# Altium PCB Main-Board-V1.1.PcbDoc (part 5 of 5)
Units mil, origin at the board's own origin, x right, y up, seen from the top; angles counter-clockwise.
Board outline 3599.72 x 1771.65 mil, 4 copper layers (Top Layer, Layer 1, Layer 2, Bottom Layer), stack 62.449 mil thick; 176 components, 132 nets, 634 pads, 296 vias.
Unrouted connection lines stored in the file: 17.
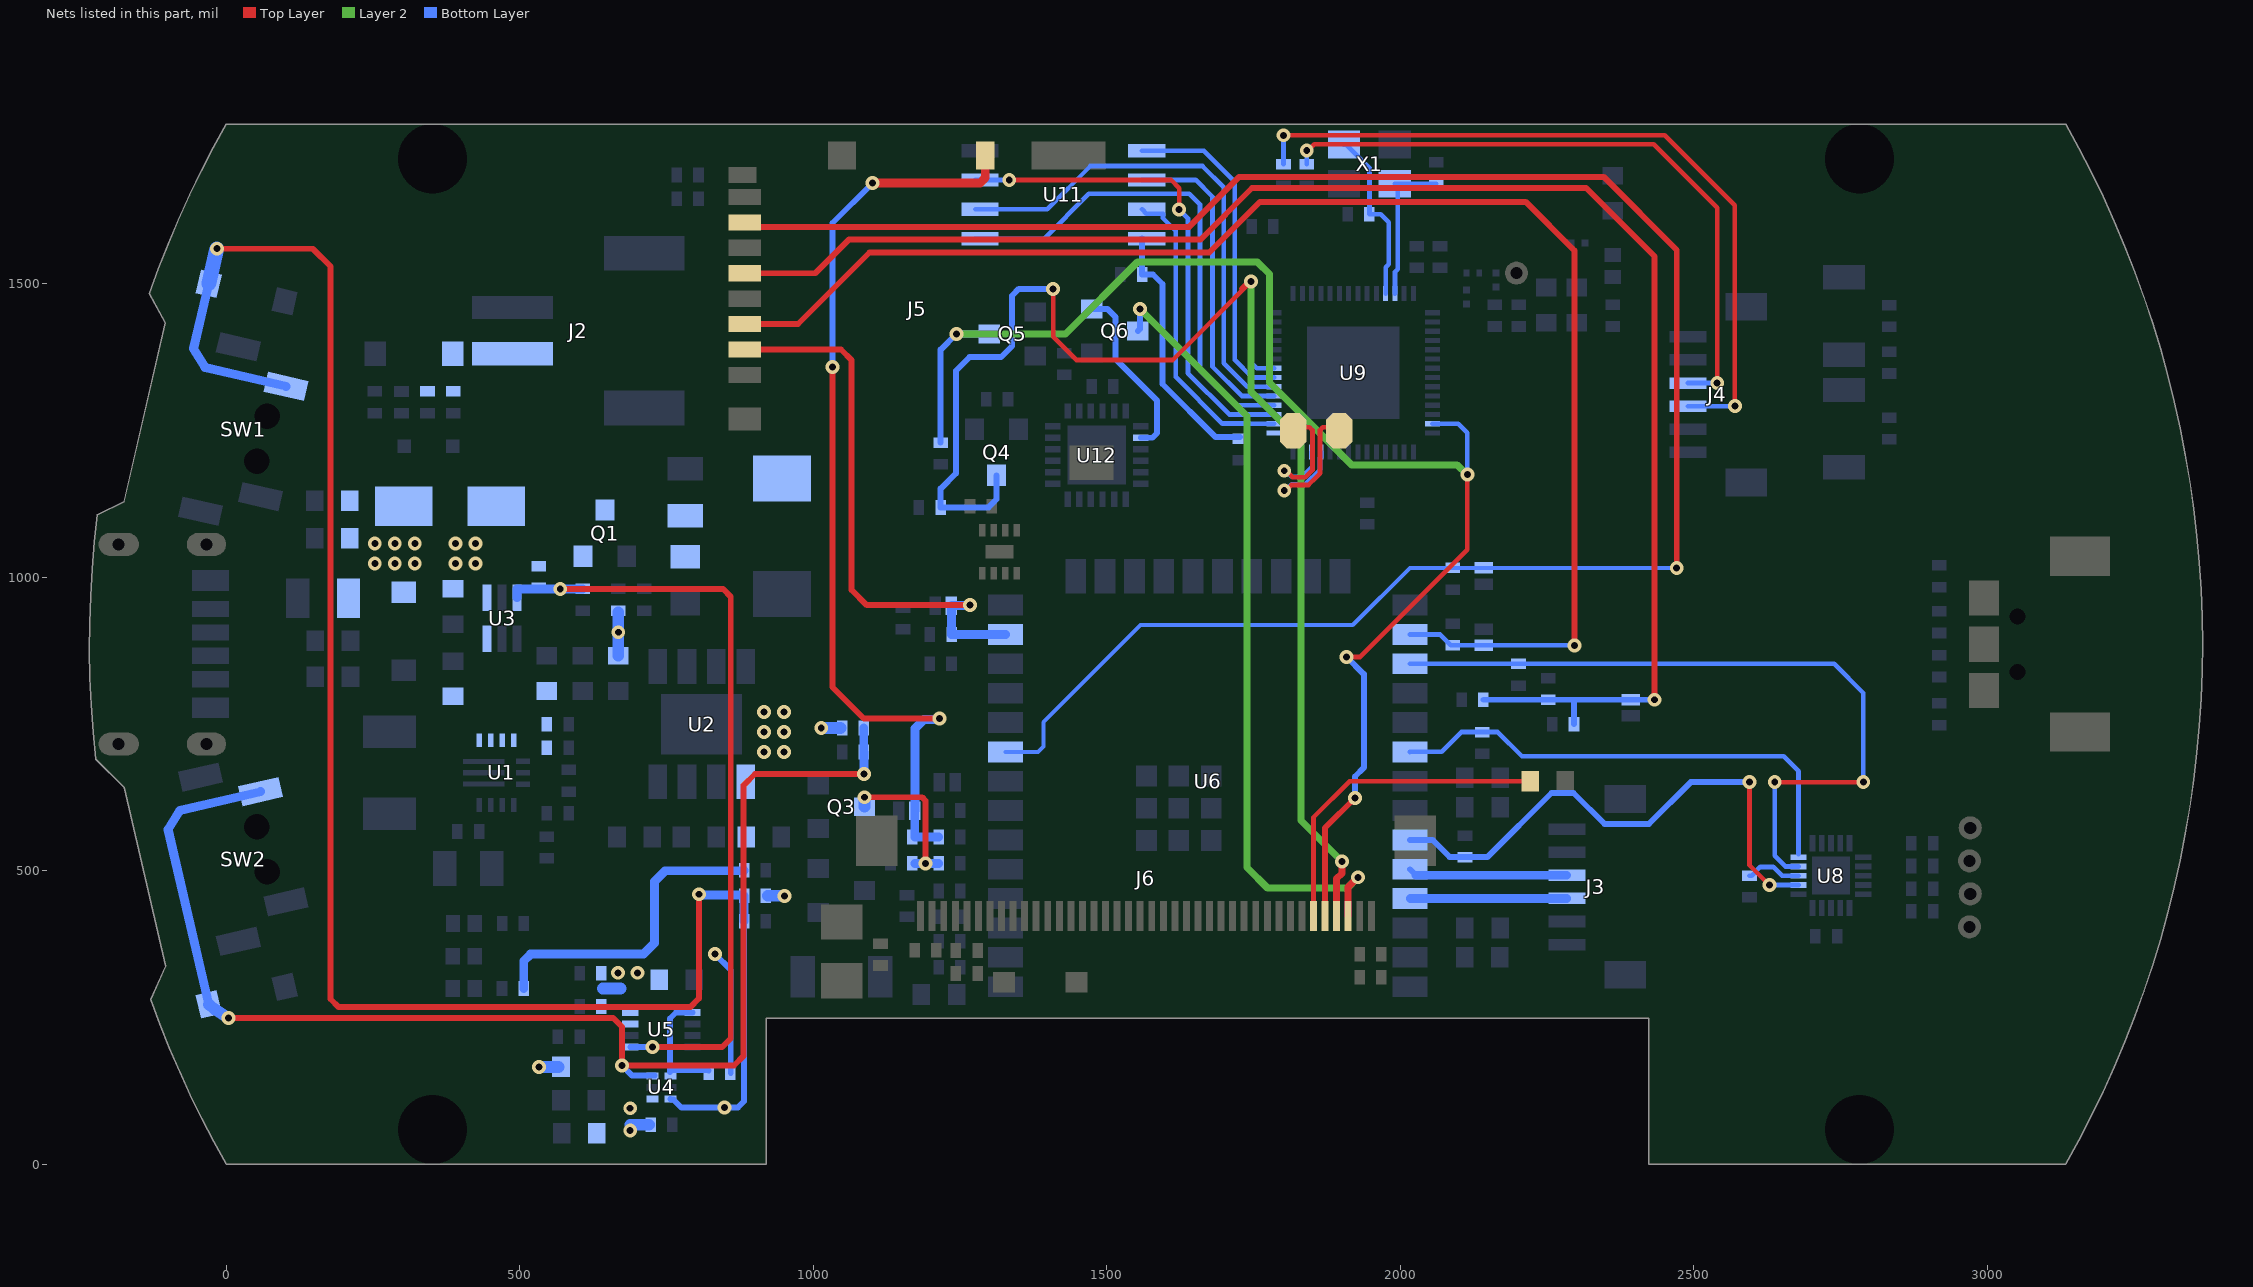
[diagram p5: the nets of this part, all layers, seen from the top]

## Via types
v1: diameter 23.62, hole 11.81, Top Layer to Bottom Layer, 296 vias

## Nets (pads, with @x,y where several pads share a name; then routed paths per layer and width w, separated by ;. In a path a pad name is that pad's centre, name@x,y a point inside that pad or via, vN(x,y) a via of type N, cw(c..) or ccw(c..) an arc to the next point about the centre after c; other vN are vias at no path point) (continued)
PB2_ILV: Q3.3 R22.1 R27.1 | length 269.4
  Top Layer w10: v1(1087.47,625) 1185.54,625 1191.39,619.15 v1(1191.39,512.4)
  Bottom Layer w15: R22.1@1173.67,512.38 v1@1193.72,512.38 ; v1@1193.74,512.36 R27.1@1213.83,512.36
  Bottom Layer w20: Q3.3@1087.47,608.86 v1(1087.47,625)
PB_1: D2.2 R9.1 R23.1 SW1.1 U4.3 | length 3185.5
  Top Layer w10: v1(-15.87,1559.51) 147.49,1559.51 177.57,1529.43 177.57,281.43 191.55,267.45 790.48,267.45 805.19,282.16 v1(805.19,459.85)
  Bottom Layer w10: U4.3@756.58,111.12 757.49,110.21 761.82,110.21 775.44,96.6 v1(848.97,96.6) 852.66,96.6 871.6,96.6 882.29,107.29 R23.1@882.29,413.96
  Bottom Layer w15: D2.2@-29.86,1499.55 -55.64,1389.05 -35.83,1357.18 SW1.1@102.05,1325.01 ; v1@809.19,459.85 810.55,458.49 880.93,458.49 R9.1@882.29,457.13 R23.1@882.29,413.96
  Bottom Layer w25: D2.2@-29.86,1499.55 v1(-15.87,1559.51)
PB_2: D3.2 R11.1 R24.1 SW2.1 U4.6 | length 2299.6
  Top Layer w10: v1@3.89,244.88 8.3,249.3 659.01,249.3 674.5,233.81 v1(674.5,167.99) 864.96,167.99 881.51,184.54 881.51,645.45 900.82,664.76 v1(1086.57,664.76)
  Bottom Layer w10: v1(674.5,167.99) 691.69,150.81 U4.6@730.1,150.81
  Bottom Layer w15: D3.2@-29.42,272.21 -99.04,570.57 -79.22,602.44 SW2.1@58.65,634.61 ; R11.1@1086.18,743 R24.1@1086.18,702.06 1086.37,701.87 1086.37,664.95 v1(1086.57,664.76)
  Bottom Layer w20: D3.2@-29.42,272.21 -18.9,263.56 v1@3.87,249.38
  other v1: 3.89,249.3
PWR_EN: R37.2 R69.1 U3.3 U5.5 | length 1352.7
  Top Layer w10: v1(569.1,980.07) 846.36,980.07 859.58,966.84 859.58,214.22 844.79,199.43 v1(726.28,199.43)
  Bottom Layer w10: U5.5@688.28,199.43 v1(726.28,199.43)
  Bottom Layer w15: U3.3@495.59,965.04 495.59,979.69 495.96,980.07 R37.2@607.5,980.04
RESET: Q6.2 U12.2 | length 304.6
  Bottom Layer w10: Q6.2@1474.33,1456.8 1474.56,1456.57 1501.58,1456.57 1514.71,1443.45 1514.71,1371.94 1585.98,1300.66 1585.98,1245.58 1577.89,1237.49 U12.2@1558.11,1237.49
RST_OUT: R13.1 U4.1 U5.1 | length 199.9
  Bottom Layer w10: 756.11,156.97 756.11,160.08 ; U5.1@794.58,258.49 766.41,258.49 756.11,248.19 756.11,160.08 ; R13.1@822.01,159.37 756.69,160.07 756.11,160.08
RXD0: J3.4 U6.34 | length 271.4
  Bottom Layer w10: U6.34@2016.54,502.36 U6.34@2026.77,492.13
  Bottom Layer w15: U6.34@2026.77,492.13 J3.4@2283.72,492.13
RXD0-2: J4.4 R68.2 | length 1132.6
  Top Layer w8: v1(1840.83,1726.58) 1842.55,1726.58 1853.32,1737.35 2431.65,1737.35 2540,1629 v1(2540,1330.69)
  Bottom Layer w8: R68.2@1840.82,1703.55 v1(1840.83,1726.58) 1840.82,1713.55 ; J4.4@2490.3,1330.69 v1(2540,1330.69)
SCL: J6.4 Q4.3 R56.2 U9.36 | length 2499.9
  Top Layer w8: v1(1408.79,1491.14) 1408.79,1409.76 1448.69,1369.86 1612.06,1369.86 v1(1745.57,1503.38) 1741.34,1503.38 1729.11,1491.14
  Top Layer w12: J6.4@1891.66,423 1891.66,486.57 1900.55,495.46 v1(1900.55,515.88)
  Layer 2 w12: v1(1745.57,1503.38) 1745.57,1316.49 1831.03,1231.03 1831.03,585.4 v1(1900.55,515.88)
  Bottom Layer w8: v1(1745.57,1503.38) 1745.57,1366.28 1755.98,1355.87 U9.36@1785.16,1355.87
  Bottom Layer w10: Q4.3@1312.35,1173.41 1312.35,1132.64 1298.41,1118.7 R56.2@1217.13,1118.7 1217.13,1150.8 1243.17,1176.84 1243.17,1351.65 1266.27,1374.74 1319.77,1374.74 1338.59,1393.57 1338.59,1479.4 1350.34,1491.14 v1(1408.79,1491.14)
SD_CLK: D8.2 J5.5 R2.1 R43.1 R46.2 | length 2745.8
  Top Layer w10: J5.5@883.69,1517.69 1003.47,1517.69 1060.78,1575 1659.8,1575 1747.62,1662.82 2316.69,1662.82 2433,1546.51 v1(2433,791.11)
  Bottom Layer w10: R46.2@2141.7,791.11 R43.1@2252.22,791.11 2296.04,791.11 ; R2.1@2296.04,749.6 2296.04,791.11 ; v1(2433,791.11) 2296.04,791.11
SD_CMD: D7.2 J5.3 R42.1 U6.26 | length 2494.1
  Top Layer w10: J5.3@883.69,1431.08 974.17,1431.08 1096,1552.91 1674.71,1552.91 1761.09,1639.3 2213.7,1639.3 2296.82,1556.18 v1(2296.82,883.86)
  Bottom Layer w8: U6.26@2016.54,902.36 2067.66,902.34 2086.14,883.86 D7.2@2142.69,883.86 v1(2296.82,883.86)
SD_CS: D6.2 J5.2 R17.1 U6.13 | length 965.7
  Top Layer w10: J5.2@883.69,1387.77 1047.19,1387.77 1065.55,1369.42 1065.55,978.19 1091.37,952.36 v1(1267,952.36)
  Bottom Layer w15: v1(1267,952.36) 1266.37,951.73 1235.96,951.73 D6.2@1235.33,951.1 1235.58,950.86 1235.58,902.61 R17.1@1235.82,902.36 U6.13@1327.56,902.36
SD_DATA0: D9.2 J5.7 R44.1 U6.9 | length 3516.3
  Top Layer w10: J5.7@883.69,1604.3 891.21,1596.79 1640.58,1596.79 1725.71,1681.91 2346.46,1681.91 2471,1557.37 v1(2471,1015.73)
  Bottom Layer w7: U6.9@1327.56,702.36 1382.74,702.36 1392.06,711.68 1392.06,752.88 1557.52,918.34 1919.11,918.34 2016.5,1015.73 R44.1@2089.64,1015.73 D9.2@2142.69,1015.73 v1(2471,1015.73)
SD_DET: D10.2 J5.SW-A R28.1 R45.1 | length 1599.9
  Top Layer w10: v1(1033,1358.24) 1033,812.57 1086.57,759 v1(1215,759)
  Top Layer w15: v1(1101,1671.23) 1284.14,1671.23 1293.14,1680.24 J5.SW-A@1293.14,1718.48
  Bottom Layer w10: v1(1033,1358.24) 1033,1603.23 v1(1101,1671.23)
  Bottom Layer w15: D10.2@1173.65,602.36 D10.2@1172.93,602.36 ; R28.1@1213.83,557.36 1173.65,557.36 1172.93,558.08 D10.2@1172.93,602.36 ; v1(1215,759) 1213.35,757.35 1188.58,757.35 1173.29,742.06 1173.29,602.72 D10.2@1172.93,602.36
SDA: J6.5 Q5.3 R58.2 U9.13 | length 2457.8
  Top Layer w8: v1(1908.7,864.14) 1931.53,864.14 2114.3,1046.91 v1(2114.3,1174.7)
  Top Layer w10: J6.5@1871.98,423 1871.98,572.89 v1(1922.94,623.84)
  Layer 2 w12: v1(1243.97,1414.38) 1429.99,1414.38 1552.12,1536.51 1756.93,1536.51 1777.25,1516.19 1777.25,1331.34 1917.23,1191.37 2096.98,1191.37 2113.64,1174.7 v1(2114.3,1174.7)
  Bottom Layer w8: U9.13@2054.84,1261.39 2098.67,1261.39 2114.3,1245.75 v1(2114.3,1174.7)
  Bottom Layer w10: R58.2@1217.13,1229.27 1217.13,1387.54 v1(1243.97,1414.38) ; v1(1908.7,864.14) 1938.06,834.78 1938.06,675.51 1922.94,660.38 v1(1922.94,623.84)
  Bottom Layer w12: v1(1243.97,1414.38) Q5.3@1299.71,1414.39
SPICLK: U9.33 U11.6 | length 546.9
  Bottom Layer w8: U11.6@1560.22,1676.58 U11.6@1568.22,1676.58 1651.45,1676.58 1680.2,1647.83 1680.2,1358.36 1729.93,1308.63 U9.33@1785.16,1308.63
SPICS0: U9.32 U11.1 | length 855
  Bottom Layer w8: U11.1@1276.36,1576.58 U11.1@1284.36,1576.58 1393.3,1576.58 1469.76,1653.04 1640.68,1653.04 1658.78,1634.94 1658.78,1352.74 1718.64,1292.88 U9.32@1785.16,1292.88
SPID: U9.35 U11.5 | length 563.1
  Bottom Layer w8: U11.5@1560.22,1726.58 1665.7,1726.58 1718.34,1673.94 1718.34,1369.98 1748.19,1340.13 U9.35@1785.16,1340.13
SPIHD: U9.30 U11.7 | length 526.4
  Bottom Layer w8: U11.7@1560.22,1626.58 1567.64,1619.17 1595.91,1619.17 1595.91,1611.28 1617.52,1589.67 1617.52,1341.1 1696.98,1261.64 1733.98,1261.64 1734.23,1261.39 U9.30@1785.16,1261.39
SPIQ: U9.34 U11.2 | length 870.7
  Bottom Layer w8: U11.2@1276.36,1626.58 U11.2@1284.36,1626.58 1398.58,1626.58 1472.41,1700.41 1663.14,1700.41 1699.53,1664.02 1699.53,1364.24 1739.39,1324.38 U9.34@1785.16,1324.38
SPIWP: U9.31 U11.3 | length 857.4
  Top Layer w8: v1(1334,1676.58) 1609.54,1676.58 1623.41,1662.71 v1(1623.41,1626.46)
  Bottom Layer w8: U11.3@1276.36,1676.58 v1(1334,1676.58) ; v1@1331.01,1673.59 v1(1334,1676.58) ; v1@1331.01,1676.58 v1(1334,1676.58) ; v1(1623.41,1626.46) 1638.32,1611.55 1638.32,1347.5 1708.69,1277.13 U9.31@1785.16,1277.13
TOUCH_CHNG: R48.1 U6.27 U8.14 | length 1269.1
  Top Layer w8: v1(2638,650.75) v1(2788.84,650.75)
  Bottom Layer w8: U6.27@2016.54,852.36 R48.1@2201.43,852.36 2739.11,852.36 2788.84,802.63 v1(2788.84,650.75) ; v1(2638,650.75) 2638,525.37 2656.15,507.22 U8.14@2678.61,507.22
TOUCH_RST: R54.2 U8.13 | length 95.9
  Bottom Layer w8: R54.2@2595,491.47 2598.5,491.47 2613.39,506.36 2635.54,506.36 2650.42,491.47 U8.13@2678.61,491.47
TOUCH_SCL: R47.1 U6.30 U8.15 | length 845.7
  Bottom Layer w8: U6.30@2016.17,702 U6.30@2016.54,702.36 2070.51,702.36 2104.25,736.1 R47.1@2139.69,736.1 2166.09,736.1 2207.48,694.71 2653.29,694.71 2678.61,669.39 2678.61,527.89
TOUCH_SDA: R34.1 U6.33 U8.12 | length 925.9
  Top Layer w8: v1(2595,650.75) 2595,509.55 v1(2629,475.55)
  Bottom Layer w8: v1(2629,475.55) 2629.09,475.64 2678.52,475.64 U8.12@2678.61,475.73
  Bottom Layer w10: U6.33@2016.54,552.36 2055.26,552.36 2084.09,523.53 2110.2,523.53 2148.88,523.53 2257.6,632.25 2295.28,632.25 2348.19,579.34 2423.6,579.34 2495.02,650.75 v1(2595,650.75)
TP_INT: J6.6 R62.1 | length 562.6
  Top Layer w8: J6.6@1852.29,423 1852.29,591.03 1913.62,652.36 R62.1@2221.43,652.36
TP_RESET: J6.3 Q6.3 | length 1350.1
  Top Layer w12: J6.3@1911.35,423 1911.35,471.76 v1(1928.26,488.67)
  Layer 2 w12: v1(1556.51,1456.8) 1739.06,1274.26 1739.06,505.38 1774.36,470.08 1909.67,470.08 v1(1928.26,488.67)
  Bottom Layer w10: Q6.3@1553.07,1419.4 1556.51,1422.84 v1(1556.51,1456.8)
TXD0: J3.3 U6.35 | length 267.3
  Bottom Layer w10: U6.35@2016.54,452.36 U6.35@2016.93,452.76
  Bottom Layer w15: U6.35@2016.93,452.76 J3.3@2283.72,452.76
TXD0-2: J4.3 R55.2 | length 1289.2
  Top Layer w8: v1(1801.02,1752.68) 2450.58,1752.68 2570,1633.26 v1(2570,1291.32)
  Bottom Layer w8: R55.2@1801.02,1703.55 v1(1801.02,1752.68) ; J4.3@2490.3,1291.32 v1(2570,1291.32)
USB_D_N: TP6.2 U9.25 | length 294.1
  Top Layer w8: v1(1802.39,1147.62) 1805.55,1147.62 1814.89,1156.97 1843.63,1156.97 1855.89,1169.22 1863.51,1176.84 1863.51,1250.54 1868.19,1255.22 1882.34,1255.22 TP6.2@1896.38,1269.26
  Bottom Layer w8: v1(1802.39,1147.62) 1805.27,1147.62 1815.58,1157.94 1838.47,1157.94 1863.51,1182.98 1863.51,1203.32 1864.88,1204.69 U9.25@1864.88,1213.16
USB_D_P: TP6.1 U9.26 | length 251.8
  Top Layer w8: v1(1802.39,1181.25) 1805.27,1181.25 1816.55,1169.97 1838.25,1169.97 1850.51,1182.22 1850.51,1250.54 1845.82,1255.22 1831.67,1255.22 TP6.1@1817.64,1269.26
  Bottom Layer w8: v1(1802.39,1181.25) 1805.27,1181.25 1815.58,1170.94 1833.08,1170.94 1850.51,1188.36 1850.51,1203.32 1849.13,1204.69 U9.26@1849.13,1213.16
VBATT: C10.2 C13.2 D4.2 J2.2 L1.2 Q1.3 R6.2 R40.2
VCC: C11.1 C15.2 C16.2 C17.2 C18.2 D5.1 Q1.2 R9.2 R11.2 R13.2 R14.1 R16.2 R69.2 U3.1 U4.4 U5.7 U5.8 | length 370.4
  Bottom Layer w10: v1(832.74,357.83) 859.58,330.98 R13.2@859.58,155.49
  Bottom Layer w20: v1(533,165.72) R16.2@566.31,165.72 ; 641.57,299.31 671.62,299.31 ; v1@688.28,67.31 C18.2@720.34,67.31 ; R9.2@922.44,457.13 v1(951.35,457.13) ; v1(1013.73,743) R11.2@1046.37,743
  other v1: 688.28,57.31 688.28,95.26 667.62,325.98 700.43,325.98 390.94,1023.43 425,1023.43 390.94,1057.49 425,1057.49
VCC_SYS: C5.2 C12.1 R12.2 R65.2 U1.4 U1.5 U1.6 U1.7 U3.6
VDD-SDIO: C41.2 C46.1 U9.29 U11.8 | length 442.2
  Bottom Layer w10: U11.8@1560.22,1576.58 C46.1@1560.22,1515.58 1578.79,1515.58 1595.16,1499.21 1595.16,1329.13 1685.83,1238.46 C41.2@1727.04,1238.46
VUSB: C1.2 C2.2 C8.2 C9.2 D1.2 D5.2 F1.2 R4.2 R5.2 R18.1 U2.1 | length 624.5
  Bottom Layer w10: R18.1@668,940.2 R18.1@668,943.04
  Bottom Layer w15: R4.2@506.85,299.31 506.85,346.11 518.57,357.83 710.67,357.83 729.5,376.66 729.5,481.39 747.8,499.69 881.53,499.69 C2.2@882.29,500.45
  Bottom Layer w20: R5.2@668,866.06 v1(668,906.16) R18.1@668,940.2
  other v1: 916.15,701.88 950.21,701.88 916.15,735.94 950.21,735.94 916.15,770 950.21,770 253.21,1023.43 287.27,1023.43 321.34,1023.43 253.21,1057.49 287.27,1057.49 321.34,1057.49
XTAL_N: C43.2 U9.53 X1.3 | length 301.4
  Bottom Layer w8: X1.3@1904.25,1736.93 1908.19,1736.93 1947.56,1697.56 C43.2@1947.56,1618.23 1966.56,1618.23 1980.53,1604.26 1980.53,1533.12 1975.12,1527.71 U9.53@1975.12,1482.84
XTAL_P: C42.2 U9.54 X1.1 | length 261.5
  Bottom Layer w8: U9.54@1990.87,1482.84 1991.2,1483.17 1991.2,1520.04 1995.53,1524.37 1995.53,1665.33 X1.1@1990.87,1670 C42.2@2061.34,1670
pads on no net: J5.1 J5.8 J6.33 J6.34 SW1.MH SW1.MP SW2.MH SW2.MP SW4. U3.4 U6.14 U6.16 U6.17 U6.18 U6.19 U6.20 U6.21 U6.22 U6.23 U6.24 U6.29 U6.32 U8.1 U8.6 U8.7 U8.10 U8.16 U8.17 U8.18 U8.19 U8.20 U9.28 U9.38 U9.39 U9.40 U9.41 U9.42 U10.5 U10.7 U12.1 U12.3 U12.8 U12.10 U12.11 U12.12 U12.13 U12.14 U12.15 U12.16 U12.17 U12.22

## Polygon pours and split planes (outlines as drawn)
3V3-DIS on Bottom Layer "3V3-DIS_L04_P003" (solid, pour order 3): 1067.87,934.65 1067.87,1531.14 1078.86,1542.13 1173.87,1542.13 1189.58,1526.42 1189.58,1198.45 1189.58,1049.3 1173.29,1033.02 1173.29,934.65
3V3 on Bottom Layer "3V3_L04_P000" (solid, pour order 0): 422.01,623.67 422.01,451 469.25,451 498,422.25 498,383.27 610.97,383.27 610.97,529.86 483.11,529.86 475.1,537.86 475.1,623.67
VCC_SYS on Bottom Layer "VCC_SYS_L04_P023" (solid, pour order 23): 419.19,917.6 419.19,827.37 403.89,812.06 368.89,812.06 368.89,727.37 385.97,710.28 524,710.28 537.37,696.91 555.37,696.91 555.37,782.56 563.87,791.06 563.87,821.06 479.75,821.06 452.28,848.52 452.28,917.6
NetL3_2 on Bottom Layer "NETL3_2_L04_P022" (solid, pour order 22): 378.33,652.02 368.16,641.84 241.03,641.84 208.57,609.38 208.57,569.53 352.09,569.53 419.6,637.04 473.92,637.04 473.92,652.02
NetL3_1 on Bottom Layer "NETL3_1_L04_P021" (solid, pour order 21): 473.92,696.91 381.12,696.91 323.34,754.69 323.34,764.42 208.57,764.42 208.57,700.12 226.76,681.94 473.92,681.94
VBATT on Bottom Layer "VBATT_L04_P010" (solid, pour order 10): 711,1002.74 808.15,1002.74 808.15,1031.82 1050,1031.82 1050,1400.32 410.91,1400.32 410.91,1175.89 615.52,1175.89 615.52,1088 711,1088
GND on Bottom Layer "GND_L04_P020" (solid, remove dead copper, pour order 20): 0,0 cw(c1566.86,885.83) 0,1771.65 3133.72,1771.65 cw(c1566.86,885.83) 3133.72,0 2423.66,0 2423.66,248.66 920.25,248.66 920.25,0
NetL1_1 on Bottom Layer "NETL1_1_L04_P017" (solid, pour order 17): 829.51,887.75 861.27,887.75 861.27,818.31 980,818.31 980,931.2 1050,931.2 1050,1010.78 829.51,1010.78
VUSB on Bottom Layer "VUSB_L04_P019" (solid, pour order 19): 869.21,680.91 897.57,680.91 897.57,797.41 980,797.41 980,584.86 920.79,584.86 920.58,584.65 920.58,522.95 900.29,522.95 900.29,487.76 869.4,487.76 869.21,487.95
VCC on Bottom Layer "VCC_L04_P008" (solid, pour order 8): 645,1068.28 595,1068.28 595,1154.46 368.89,1154.46 368.89,942.4 452.28,942.4 452.28,1024.97 462.91,1035.6 491.26,1035.6 517.26,1009.6 645,1009.6
VCC on Bottom Layer "VCC_L04_P007" (solid, remove dead copper, pour order 7): 616.47,69.81 655.74,69.81 655.74,117.03 736.51,117.03 736.51,20.39 616.47,20.39
NetF1_1 on Bottom Layer "NETF1_1_L04_P005" (solid, pour order 5): 18.73,959.45 18.73,997.56 141.64,997.56 141.64,931.89 -69.95,931.89 -82.55,919.29 -82.55,852.36 -69.95,839.76 5.04,839.76 5.04,812.2 -140.82,812.2 -154.46,825.84 -154.46,945.81 -140.82,959.45
3V3-DIS on Top Layer "3V3-DIS_L01_P028" (solid, pour order 28): 1365.17,357.37 1343.38,335.57 1343.38,292.11 1271,292.11 1271,376.64 1283.36,389 1920.9,389 1940.03,369.86 1940.03,305.86 1882.64,305.86 1831.14,357.37
3V-DIS on Top Layer "3V-DIS_L01_P024" (solid, pour order 24): 1013.64,371 1076.69,371 1099.02,348.68 1129.91,348.68 1157.89,376.65 1181.73,376.65 1181.73,343.04 1159.71,335.98 1159.71,282.4 1013.64,282.4
GND on Top Layer "GND_L01_P012" (solid, remove dead copper, pour order 12): 0,0 cw(c1566.86,885.83) 0,1771.65 3133.72,1771.65 cw(c1566.86,885.83) 3133.72,0 2423.66,0 2423.66,248.66 920.25,248.66 920.25,0
VUSB on Top Layer "VUSB_L01_P015" (solid, pour order 15): 976.4,680.91 984.47,688.97 984.47,1172.81 960.28,1197 238.11,1197 224.6,1183.49 224.6,1004.4 239,990 335.06,990 347.02,1001.97 347.02,1071.27 356.75,1081 867,1081 877.2,1070.8 877.2,690.91 887.21,680.91
3V3-DIS on Layer 2 "3V3-DIS_L03_P027" (solid, pour order 27): 3133.72,1771.65 3178.42,1687.67 3198.11,1646.72 3212.41,1615.43 3239.22,1551.5 3254.14,1513.03 3261.92,1491.23 3270.88,1466.16 3293.2,1395.24 3299.87,1373.01 3307.55,1343.81 3317.37,1306.49 3333.79,1231.06 3344.51,1169.21 3350.06,1131.1 3356.87,1078.45 3362.33,1012.5 3365.82,944.87 3366.73,871.13 3365.14,808.67 3359.76,726.76 3351,647.94 3345.01,605.35 3335.92,553.88 3333.79,540.59 3317.37,465.16 3305.1,418.54 3290.25,366.35 3274.91,316.77 3261.92,280.43 3252.23,253.94 3238.15,217.52 3219.89,172.56 3194.09,116.49 3133.72,0 2423.66,0 2423.66,248.66 1832.43,248.66 1802,279.09 1802,1528 1767.17,1562.83 1556.69,1562.83 1438.59,1444.73 1274.12,1444.73 1202.63,1373.24 1095.81,1373.24 1005.94,1463.1 1005.94,1771.65 1005.98,1771.65
3V3 on Layer 2 "3V3_L03_P026" (solid, pour order 26): 2063.7,982.31 2063.7,488.09 2199.41,352.38 2349.49,352.38 2349.49,982.31
3V-DIS on Layer 2 "3V-DIS_L03_P025" (solid, pour order 25): 1116.22,392.33 1146.42,362.13 1294.35,362.13 1336.4,320.08 1425.7,320.08 1472.27,366.66 1472.27,1122.61 1269,1325.89 1269,1436.57 1547.43,1436.57 1721.61,1262.39 1721.61,248.66 920.25,248.66 920.25,266.05 1046.53,392.33
3V3 on Layer 2 "3V3_L03_P018" (solid, remove dead copper, pour order 18): 1153.63,375.06 1304.86,375.06 1352.37,327.55 1407.67,327.55 1452.69,372.56 1452.69,1114.29 1209.34,1357.63 1087.38,1357.63 993,1452.01 993,1771.65 0,1771.65 ccw(c1566.85,885.83) 0,0 920.25,0 920.25,248.66 920.25,287.47 1055.37,422.58 1106.11,422.58
VCC on Layer 2 "VCC_L03_P016" (solid, remove dead copper, pour order 16): 899.2,269.22 899.2,20.22 471.69,20.22 453,38.91 453,330 477.17,354.17 678.65,354.17 700.24,375.76 700.24,636.32 960.79,636.32 985.35,660.88 985.35,929.48 970.24,944.58 375.32,944.58 362.61,957.29 362.61,1109.61 374,1121 1017.45,1121 1067,1121 1128.08,1059.92 1128.08,498.1
VUSB on Layer 2 "VUSB_L03_P013" (solid, pour order 13): 324,1121 211.19,1121 195.76,1105.57 195.76,689.39 228.15,657 950.97,657 972.37,678.4 972.37,911.4 959.77,924 358.98,924 342.03,940.96 342.03,1102.97
GND on Layer 1 "GND_L02_P014" (solid, remove dead copper, pour order 14): 0,0 cw(c1566.86,885.83) 0,1771.65 3133.72,1771.65 cw(c1566.86,885.83) 3133.72,0 2423.66,0 2423.66,248.66 920.25,248.66 920.25,0

## Other copper
Top Layer:
  rectangle net 3V-DIS: 1429.99,283.8 1578.11,327.55
  rectangle net 3V3-DIS: 1882.64,305.86 1940.03,369.86
  region net 3V3-DIS: 1151.11,1390.69 1151.11,1513.11 1077.51,1513.11 1077.51,1390.69
  rectangle net 3V-DIS: 1013.64,282.4 1127.06,342.48
  rectangle net 3V3-DIS: 1271,292.11 1343.38,376.64
  pour cut-out: 195.76,59.06 ccw(c351.46,59.06) 351.46,-96.64 ccw(c351.46,59.06) 507.16,59.06 ccw(c351.46,59.06) 351.46,214.75 ccw(c351.46,59.06)
  pour cut-out: 2626.57,59.06 ccw(c2782.27,59.06) 2782.27,-96.64 ccw(c2782.27,59.06) 2937.96,59.06 ccw(c2782.27,59.06) 2782.27,214.75 ccw(c2782.27,59.06)
  pour cut-out: 195.76,1712.6 ccw(c351.46,1712.6) 351.46,1556.9 ccw(c351.46,1712.6) 507.16,1712.6 ccw(c351.46,1712.6) 351.46,1868.3 ccw(c351.46,1712.6)
  pour cut-out: 2626.57,1712.6 ccw(c2782.27,1712.6) 2782.27,1556.9 ccw(c2782.27,1712.6) 2937.96,1712.6 ccw(c2782.27,1712.6) 2782.27,1868.3 ccw(c2782.27,1712.6)
  region net GND: 2679.98,1771.65 ccw(c2782.27,1712.6) 2884.55,1771.65
  region net GND: 249.17,1771.65 ccw(c351.46,1712.6) 453.74,1771.65
  region net GND: 453.74,0 ccw(c351.46,59.06) 249.17,0
  region net GND: 2884.55,0 ccw(c2782.27,59.06) 2679.98,0
Bottom Layer:
  rectangle net 3V3-DIS: 2015.53,1470.05 2063.93,1535.91
  rectangle net 3V3: 1118.65,499.86 1140.65,569.86
  rectangle net 3V3: 1118.65,387.06 1172.15,430.36
  rectangle net 3V3: 1118.65,387.06 1136.65,569.86
  rectangle net GND: 418.9,1439.68 499.21,1554.78
  rectangle net GND: 438.9,1439.68 801.1,1581.42
  rectangle net 3V3: 1268.15,334.65 1357.09,370.08
  rectangle net 3V3-DIS: 2385.62,1418.01 2424.03,1500.46
  rectangle net 3V3-DIS: 1067.87,934.65 1173.29,1123.16
  rectangle net 3V3: 1140.5,791 1207.58,920.22
  rectangle net 3V3: 2188.93,810.72 2308.19,835.26
  rectangle net 3V3: 422.01,473.86 475.1,623.67
  rectangle net PB1_ILV: 1147.15,449.36 1222.82,486.49
  rectangle net 3V3-DIS: 2231.5,1418.51 2318.5,1448.5
  rectangle net 3V3-DIS: 2231.5,1418.01 2424.03,1444.61
  rectangle net 3V3-DIS: 2042.05,1418 2318.5,1436.51
  rectangle net 3V3-DIS: 2015.53,1503.85 2080.3,1535.91
  rectangle net 3V3-DIS: 2015.53,1470.05 2040.53,1535.91
  rectangle net 3V3-DIS: 2006.4,1470.05 2035.36,1495.64
  rectangle net VDD-SDIO: 1714.54,1226.95 1739.54,1249.97
  rectangle net VDD-SDIO: 1714.54,1241.31 1795.09,1249.97
  region net GND: 191,914.1 170.67,934.43 161.24,925.01 181.57,904.68
  rectangle net GND: 365.5,1174.45 399.45,1297.3
  rectangle net GND: 574.06,831.06 595,846.25
  rectangle net GND: 314.37,842.06 403.89,859.53
  rectangle net GND: 368.89,842.06 403.89,925.26
  rectangle net GND: 750.93,20.22 802.97,81.3
  rectangle net GND: 910.31,478.96 963.65,512.95
  rectangle net NetR15_1: 622.44,91.22 645.47,132.23
  rectangle net RST_OUT: 746.35,148.57 766.82,164.87
  rectangle net VCC: 678.65,283.87 752.43,338
  rectangle net GND: 746.35,124.9 784.94,136.71
  rectangle net NetQ2_1: 910.29,401.46 928.29,429
  rectangle net NetQ2_1: 990.61,409.34 1026.84,445.24
  rectangle net NetR8_1: 710.83,539.86 790.08,574.86
  rectangle net NetR8_2: 819.21,539.86 850.79,680.91
  rectangle net VUSB: 869.21,487.95 900.29,680.91
  rectangle net NetQ1_1: 655.5,971.04 724.87,989.04
  rectangle net NetQ1_1: 655.5,971.04 698.54,1068.28
  rectangle net NetR12_1: 528.87,840 563.87,881.06
  rectangle net GND: 732.2,1165 812,1317.64
  rectangle net NetR6_1: 769.21,818.31 800.79,974.54
  rectangle net VCC_SYS: 419.19,784.33 452.28,917.6
  rectangle net BATT_ADC: 226.7,1175.89 355.5,1288.5
  rectangle net GND: 819.21,749.61 850.79,877.56
  rectangle net NetL1_1: 869.21,818.31 924.76,1010.78
  rectangle net VCC: 368.89,942.4 452.28,1154.46
  rectangle net VBATT: 330.5,1307.5 576.69,1401.5
  rectangle net VUSB: 188.89,930.63 351.86,1154.46
  rectangle net 3V3: 1241.82,334.65 1357.09,354.31
  rectangle net 3V3: 1241.82,271.58 1285.4,354.31
  rectangle net NetU5_2: 784.7,219.12 804.02,238.8
  rectangle net VCC: 655.74,54.81 736.51,117.03
  rectangle net VCC: 629.97,232.89 729.5,338
  rectangle net NetLED1_1: 411.45,285 478.85,368.35
  pour cut-out: 195.76,59.06 ccw(c351.46,59.06) 351.46,-96.64 ccw(c351.46,59.06) 507.16,59.06 ccw(c351.46,59.06) 351.46,214.75 ccw(c351.46,59.06)
  pour cut-out: 2626.57,59.06 ccw(c2782.27,59.06) 2782.27,-96.64 ccw(c2782.27,59.06) 2937.96,59.06 ccw(c2782.27,59.06) 2782.27,214.75 ccw(c2782.27,59.06)
  pour cut-out: 195.76,1712.6 ccw(c351.46,1712.6) 351.46,1556.9 ccw(c351.46,1712.6) 507.16,1712.6 ccw(c351.46,1712.6) 351.46,1868.3 ccw(c351.46,1712.6)
  pour cut-out: 2626.57,1712.6 ccw(c2782.27,1712.6) 2782.27,1556.9 ccw(c2782.27,1712.6) 2937.96,1712.6 ccw(c2782.27,1712.6) 2782.27,1868.3 ccw(c2782.27,1712.6)
  region net GND: 2884.55,0 ccw(c2782.27,59.06) 2679.98,0
  region net GND: 453.74,0 ccw(c351.46,59.06) 249.17,0
  region net GND: 249.17,1771.65 ccw(c351.46,1712.6) 453.74,1771.65
  region net GND: 2679.98,1771.65 ccw(c2782.27,1712.6) 2884.55,1771.65
  pour cut-out: 1059.36,269.87 910.29,269.87 910.29,478.94 1059.36,478.94
  pour cut-out: 2092.2,324.65 1936.19,324.65 1936.19,1043.69 2092.2,1043.69
  pour cut-out: 2252.22,324.65 2096.52,324.65 2096.52,679.86 2252.22,679.86
  pour cut-out: 403.89,919.97 227.19,919.97 227.19,930.49 403.89,930.49
  pour cut-out: 2025.68,1062 2025.68,921.23 1469.86,921.23 1469.86,1062
  pour cut-out: 1389.74,324.65 1247.21,324.65 1247.21,1062 1389.74,1062
  pour cut-out: 361.69,1298.24 312.5,1298.24 312.5,1423.16 361.69,1423.16
  pour cut-out: 1067.87,1401.5 312.5,1401.5 312.5,1423.16 1067.87,1423.16
  pour cut-out: 696.58,841.27 636.83,841.27 636.83,971.04 696.58,971.04
  pour cut-out: 498,368.39 400.72,368.39 400.72,435.06 498,435.06
  pour cut-out: 615.47,20.39 585.83,20.39 585.83,183.74 615.47,183.74
  pour cut-out: 752.58,81.43 752.58,127.81 899.86,127.81 899.86,81.43

## Silkscreen, mask and mechanical layers (free items; w line width, h text height)
Top Overlay:
  region: 3030,1081.85 2750,1081.85 2750,1063.88 3030,1063.88
  region: 3030,687.97 2750,687.97 2750,670 3030,670
  rectangle: 1530,1608.13 1660.73,1626.1
  rectangle: 1530,1271.37 1660.94,1289.34
  text "MICRO SD" at 1661.01,1271.37 h80 r90
  text "D-P" at 1764,1210 h39.37 r90
  text "D-N" at 2027.69,1210 h39.37 r90
  text "ENCODER" at 2860.94,670 h80 r90
Bottom Overlay:
  text "ENABLE" at 2873.42,1341.82 h60 r270
  text "+" at 415.96,1295.93 h80 r270
  text "Rev-v1.0" at 2990.26,1293.91 h50 r270
  text "BATTERY" at 823.66,1261 h80 r270
  text "MAIN-BOARD" at 3071.77,1226.18 h50 r270
  text "BOOT" at 2873.1,1177.9 h60 r270
  text "PWR" at 330.16,384.79 h60
  text "CHG" at 330.15,328.44 h60
  text "VOLTLINK" at 2503.59,296.07 h80 r270
  text "STBY" at 330.15,272.44 h60
  text "RST" at 894.52,264.04 h60 r270
Dimensions:
  drawing of 299 lines, arcs and shapes, not listed
  text "Layer" at 4691.2,2290 h60
  text "Name" at 5101.11,2290 h60
  text "Material" at 6030.85,2290 h60
  text "Thickness" at 6890.62,2290 h60
  text "Constant" at 7540.46,2290 h60
  text "Board Layer Stack" at 8110.32,2290 h60
  text "Top Overlay" at 5101.11,2170 h60
  text "Top Solder" at 5101.11,2050 h60
  text "Solder Resist" at 6030.85,2050 h60
  text "0.010mm" at 6890.62,2050 h60
  text "3.5" at 7540.46,2050 h60
  text "1" at 4691.2,1930 h60
  text "Top Layer" at 5101.11,1930 h60
  text "0.035mm" at 6890.62,1930 h60
  text "Dielectric 2" at 5101.11,1810 h60
  text "PP-006" at 6030.85,1810 h60
  text "0.210mm" at 6890.62,1810 h60
  text "4.1" at 7540.46,1810 h60
  text "2" at 4691.2,1690 h60
  text "Layer 1" at 5101.11,1690 h60
  text "CF-004" at 6030.85,1690 h60
  text "0.015mm" at 6890.62,1690 h60
  text "Dielectric 1" at 5101.11,1570 h60
  text "FR-4" at 6030.85,1570 h60
  text "1.065mm" at 6890.62,1570 h60
  text "4.8" at 7540.46,1570 h60
  text "3" at 4691.2,1450 h60
  text "Layer 2" at 5101.11,1450 h60
  text "CF-004" at 6030.85,1450 h60
  text "0.015mm" at 6890.62,1450 h60
  text "Dielectric 3" at 5101.11,1330 h60
  text "PP-006" at 6030.85,1330 h60
  text "0.210mm" at 6890.62,1330 h60
  text "4.1" at 7540.46,1330 h60
  text "4" at 4691.2,1210 h60
  text "Bottom Layer" at 5101.11,1210 h60
  text "0.035mm" at 6890.62,1210 h60
  text "Bottom Solder" at 5101.11,1090 h60
  text "Solder Resist" at 6030.85,1090 h60
  text "0.010mm" at 6890.62,1090 h60
  text "3.5" at 7540.46,1090 h60
  text "Bottom Overlay" at 5101.11,970 h60
  text "Total board thickness:" at 4691.2,850 h60
  text "1.607mm" at 6890.62,850 h60
Board outline:
  lines w1: -218.82,1106.36 -218.82,1106.41
  lines w5: -219.31,1106.51 ccw(c1569.7,885.13) -222.34,689.82 -173.7,641.84 -103.3,336.87 -128.45,280.38 ccw(c1557.47,883.14) 0,0 920.25,0 920.25,248.66 2423.66,248.66 2423.66,0 3133.72,0 ccw(c1566.86,885.83) 3133.72,1771.65 0,1771.65 ccw(c1566.72,885.89) -131.18,1482.83 -103.62,1433.37 -174.03,1128.39 -218.82,1106.36 ; -218.82,1106.41 -218.83,1106.45 ; 3236.77,905.51 3233.99,905.51 3233.99,944.87 3102.96,944.87 ; 3236.77,905.51 cw(c3236.77,888.51) 3253.78,888.51 3253.78,883.15 cw(c3236.77,883.15) 3236.77,866.15 3234.14,866.15 3234.14,826.76 3102.95,826.76 ; 3087.25,905.5 ccw(c3087.25,888.5) 3070.25,888.5 3070.25,883.14 ccw(c3087.25,883.14) 3087.25,866.14 3102.95,866.14 3102.95,826.77 ; 3087.25,905.49 ccw(c3087.25,905.5) 3087.26,905.5 ; 3087.26,905.5 3102.95,905.5 ; 3102.95,826.76 ccw(c3102.95,826.77) 3102.95,826.77 ; 3102.95,905.5 ccw(c3102.95,905.5) 3102.96,905.51 ; 3102.96,905.51 3102.96,944.87 ; 3102.96,944.87 ccw(c3102.96,944.88) 3102.96,944.87 ; 3221.06,826.76 ccw(c3221.06,826.77) 3221.06,826.76
Mechanical 13:
  lines w5: 3221.06,944.87 ccw(c3221.07,944.88) 3221.07,944.87
Drill Drawing:
  circle w10: c4690.62,3482.28 r33.33
  lines w10: 4657.29,3065.61 4723.96,3065.61 4690.62,2998.94 4657.29,3065.61 ; 4657.29,3165.61 4673.96,3165.61 4690.62,3148.94 4707.29,3165.61 4723.96,3165.61 4707.29,3182.28 4723.96,3198.94 4707.29,3198.94 4690.62,3215.61 4673.96,3198.94 4657.29,3198.94 4673.96,3182.28 4657.29,3165.61 ; 4657.29,3298.94 4657.29,3315.61 4673.96,3332.28 4657.29,3348.94 4657.29,3365.61 4673.96,3365.61 4690.62,3348.94 4707.29,3365.61 4723.96,3365.61 4723.96,3348.94 4707.29,3332.28 4723.96,3315.61 4723.96,3298.94 4707.29,3298.94 4690.62,3315.61 4673.96,3298.94 4657.29,3298.94 ; 4657.29,3598.94 4723.96,3598.94 4723.96,3665.61 4657.29,3665.61 4657.29,3598.94 ; 4657.29,3765.61 4673.96,3765.61 4673.96,3748.94 4707.29,3748.94 4707.29,3765.61 4723.96,3765.61 4723.96,3798.94 4707.29,3798.94 4707.29,3815.61 4673.96,3815.61 4673.96,3798.94 4657.29,3798.94 4657.29,3765.61
  lines w15: 4597.5,2953.94 15148.58,2953.94 ; 4597.5,3853.94 15148.58,3853.94 ; 5148.38,2803.94 5148.38,4003.94 ; 5738.22,2803.94 5738.22,4003.94 ; 6857.89,2803.94 6857.89,4003.94 ; 7363.77,2803.94 7363.77,4003.94 ; 8097.57,2803.94 8097.57,4003.94 ; 9597.12,2803.94 9597.12,4003.94 ; 10186.97,2803.94 10186.97,4003.94 ; 10932.77,2803.94 10932.77,4003.94 ; 11582.6,2803.94 11582.6,4003.94 ; 12436.36,2803.94 12436.36,4003.94 ; 13769.97,2803.94 13769.97,4003.94 ; 4597.5,2803.94 15148.58,2803.94 15148.58,4003.94 4597.5,4003.94 4597.5,2803.94
  text "Symbol" at 4687.5,3898.94 h72
  text "Count" at 5193.38,3898.94 h72
  text "Hole Size" at 5783.22,3898.94 h72
  text "Plated" at 6902.89,3898.94 h72
  text "Hole Type" at 7408.77,3898.94 h72
  text "Drill Layer Pair" at 8142.57,3898.94 h72
  text "Via/Pad" at 9642.12,3898.94 h72
  text "Pad Shape" at 10231.97,3898.94 h72
  text "Template" at 10977.77,3898.94 h72
  text "Description" at 11627.6,3898.94 h72
  text "Hole Tolerance (+)" at 12481.36,3898.94 h72
  text "Hole Tolerance (-)" at 13814.97,3898.94 h72
  text "2" at 5193.38,3748.94 h60
  text "27.56mil (0.700mm)" at 5783.22,3748.94 h60
  text "NPTH" at 6902.89,3748.94 h60
  text "Round" at 7408.77,3748.94 h60
  text "Top Layer - Bottom Layer" at 8142.57,3748.94 h60
  text "Pad" at 9642.12,3748.94 h60
  text "Rounded" at 10231.97,3748.94 h60
  text "c0hn70p0" at 10977.77,3748.94 h60
  text "4" at 5193.38,3598.94 h60
  text "20.47mil (0.520mm)" at 5783.22,3598.94 h60
  text "PTH" at 6902.89,3598.94 h60
  text "Slot" at 7408.77,3598.94 h60
  text "Top Layer - Bottom Layer" at 8142.57,3598.94 h60
  text "Pad" at 9642.12,3598.94 h60
  text "Rounded" at 10231.97,3598.94 h60
  text "(Mixed)" at 10977.77,3598.94 h60
  text "4" at 5193.38,3448.94 h60
  text "43.31mil (1.100mm)" at 5783.22,3448.94 h60
  text "NPTH" at 6902.89,3448.94 h60
  text "Round" at 7408.77,3448.94 h60
  text "Top Layer - Bottom Layer" at 8142.57,3448.94 h60
  text "Pad" at 9642.12,3448.94 h60
  text "Rounded" at 10231.97,3448.94 h60
  text "c0hn110" at 10977.77,3448.94 h60
  text "4" at 5193.38,3298.94 h60
  text "118.11mil (3.000mm)" at 5783.22,3298.94 h60
  text "PTH" at 6902.89,3298.94 h60
  text "Round" at 7408.77,3298.94 h60
  text "Top Layer - Bottom Layer" at 8142.57,3298.94 h60
  text "Pad" at 9642.12,3298.94 h60
  text "Rounded" at 10231.97,3298.94 h60
  text "c152h300" at 10977.77,3298.94 h60
  text "5" at 5193.38,3148.94 h60
  text "20.47mil (0.520mm)" at 5783.22,3148.94 h60
  text "PTH" at 6902.89,3148.94 h60
  text "Round" at 7408.77,3148.94 h60
  text "Top Layer - Bottom Layer" at 8142.57,3148.94 h60
  text "Pad" at 9642.12,3148.94 h60
  text "Rounded" at 10231.97,3148.94 h60
  text "c100h52" at 10977.77,3148.94 h60
  text "296" at 5193.38,2998.94 h60
  text "11.81mil (0.300mm)" at 5783.22,2998.94 h60
  text "PTH" at 6902.89,2998.94 h60
  text "Round" at 7408.77,2998.94 h60
  text "Top Layer - Bottom Layer" at 8142.57,2998.94 h60
  text "Via" at 9642.12,2998.94 h60
  text "Rounded" at 10231.97,2998.94 h60
  text "v60h30" at 10977.77,2998.94 h60
  text "315 Total" at 5193.38,2848.94 h60
  text "Slot definitions :" at 4687.5,2703.97 h60
  text "Routed Path Length" at 5720.19,2703.97 h60
  text "= Calculated from tool start centre position to tool end centre position." at 6822.86,2703.97 h60
  text "Hole Length" at 5720.19,2603.99 h60
  text "= Routed Path Length + Tool Size = Slot length as defined in the PCB layout" at 6412.99,2603.99 h60

## Dimensions
-232.95,885.13 to 3366.79,885.83 on Dimensions
3133.72,0 to 3133.72,1771.65 on Dimensions
0,1771.65 to 3133.72,1771.65 on Dimensions

## Text inside footprints (layer, text, board x,y; h text height)
C30: Top Overlay "+" at 1061.14,254.12 h25 r90
J6: Top Overlay "1" at 1955.86,488.98 h30 r180; Top Overlay "40" at 1207.86,492.98 h30 r180; Mechanical 13 "PCB Edge" at 1613.99,615.96 h31.5 r180